# Altium PCB PCB1.PcbDoc
Units mm, origin at the board's own origin, x right, y up, seen from the top; angles counter-clockwise.
Board outline 70 x 100 mm, 2 copper layers (Top Layer, Bottom Layer); 40 components, 25 nets, 101 pads, 0 vias.
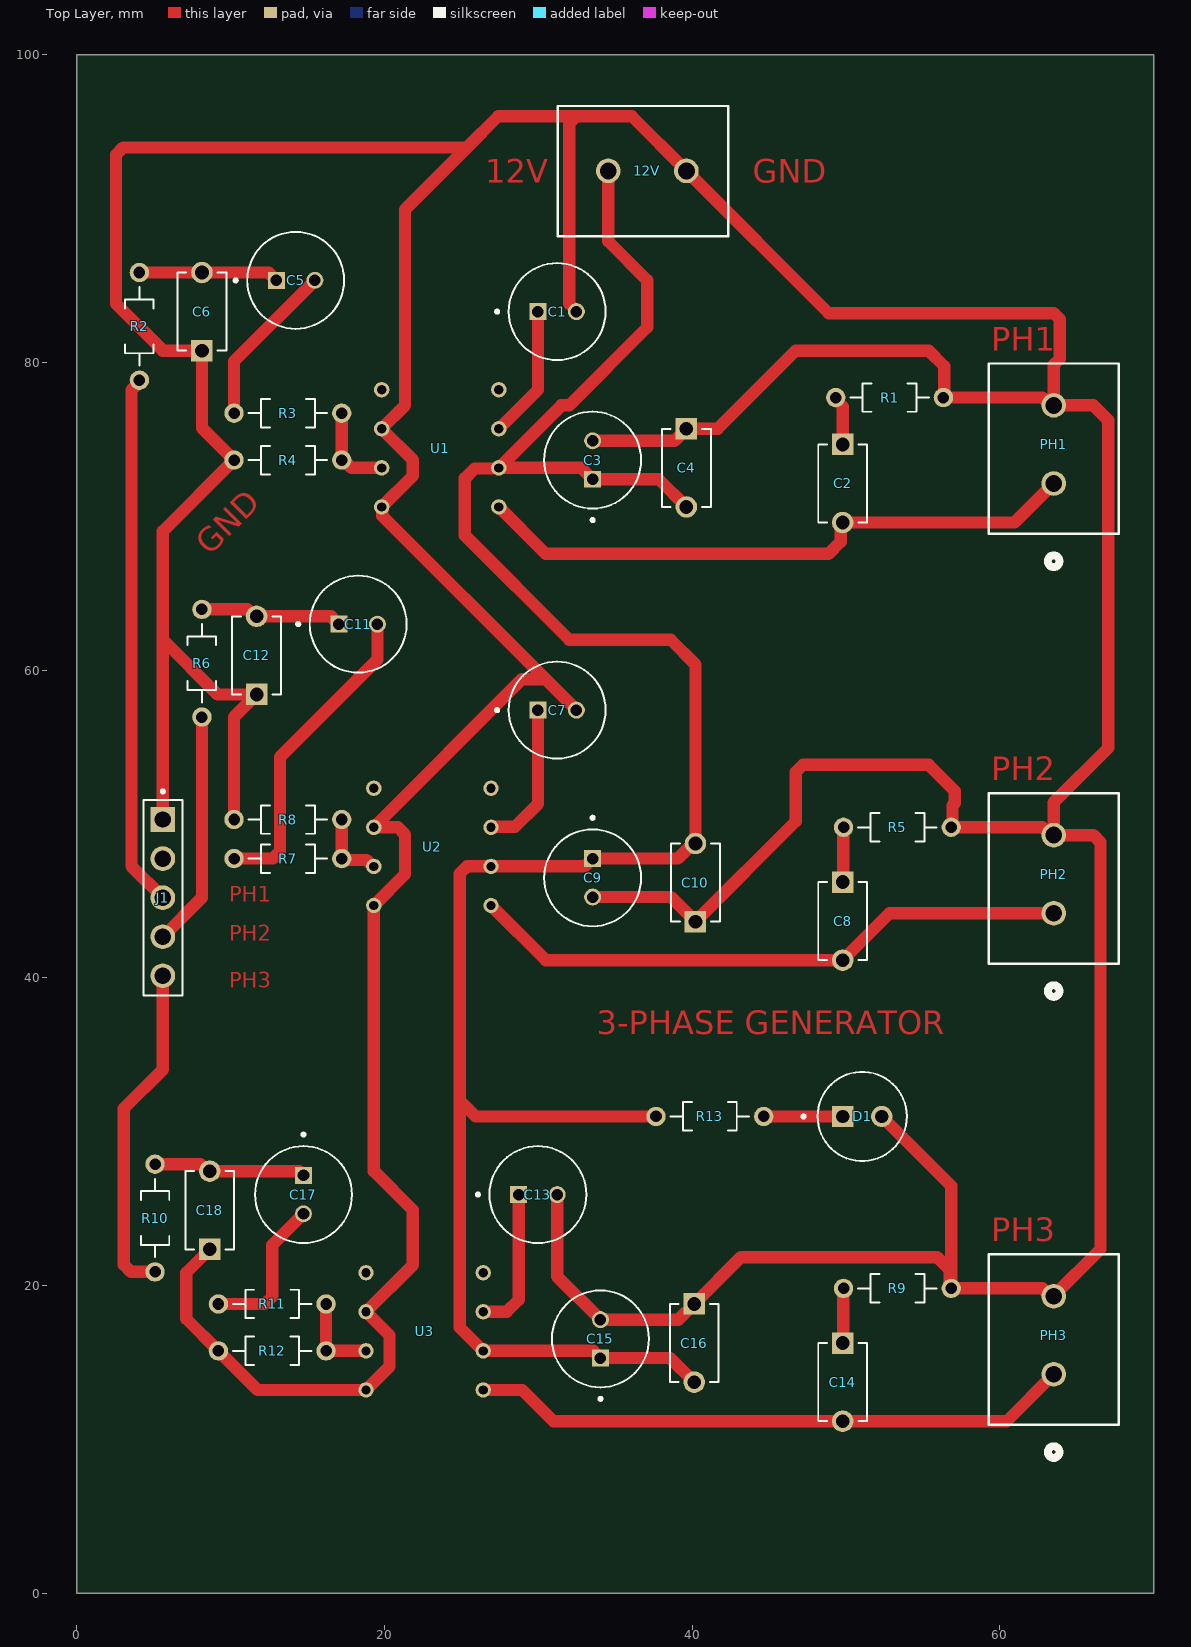
[diagram p0: Top Layer view]
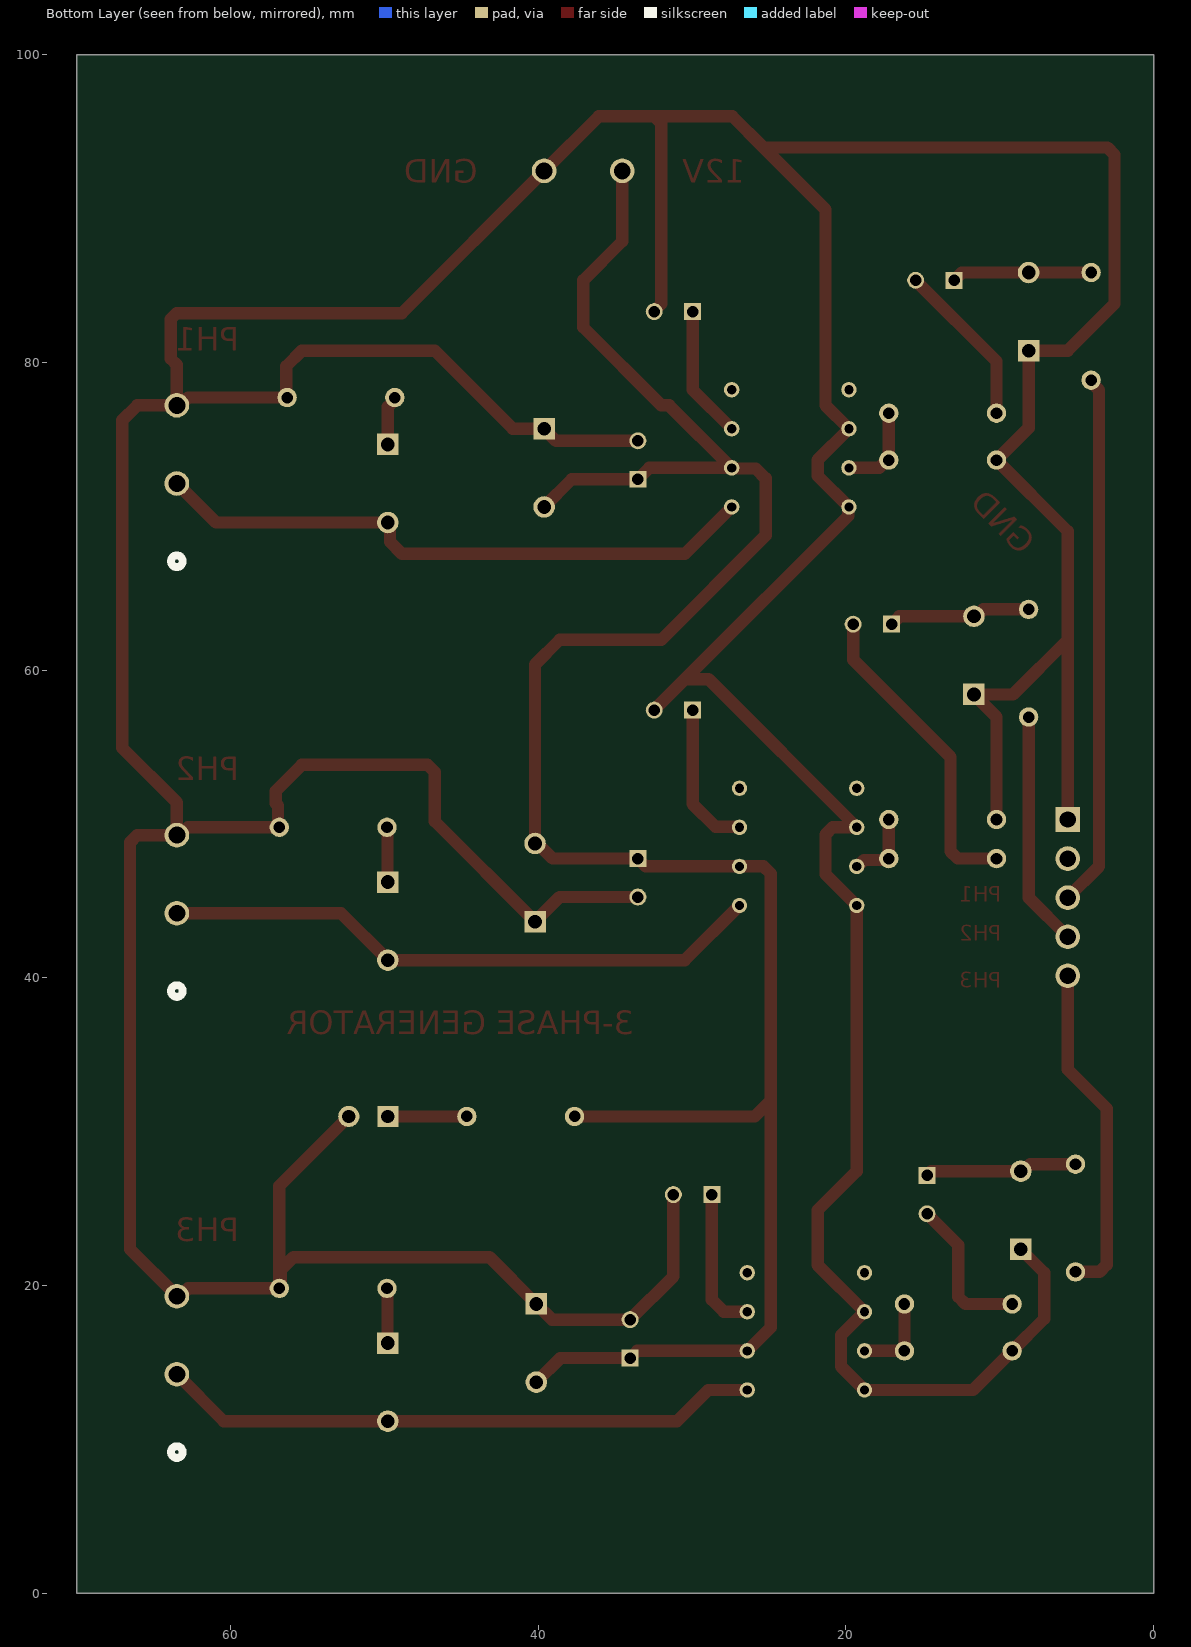
[diagram p1: Bottom Layer view, seen from below]
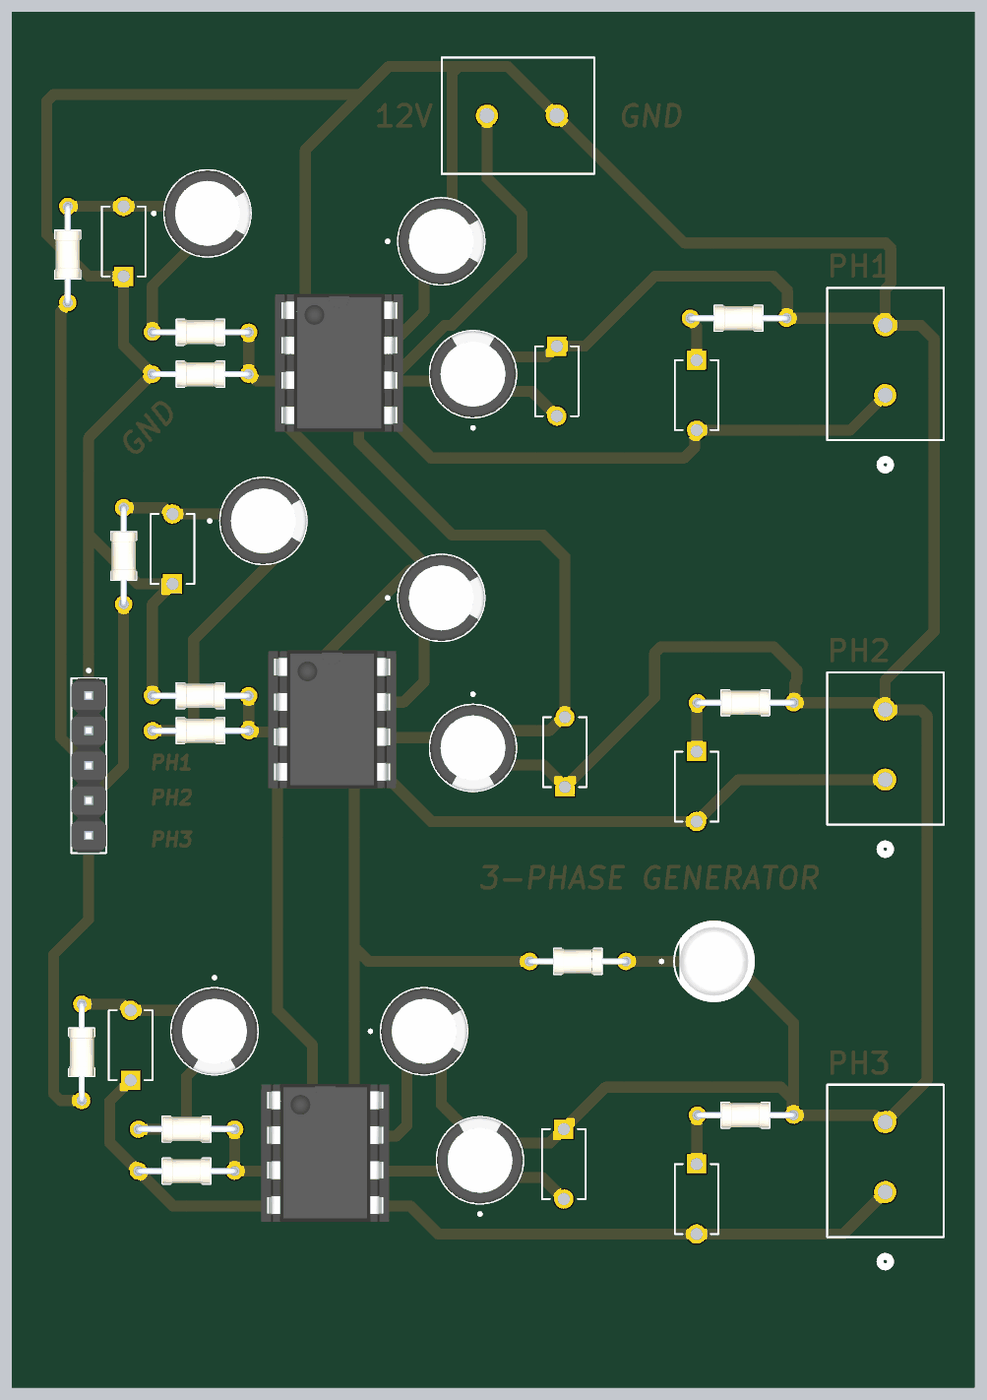
[diagram p2: 3D render of the assembled board from above, using the file's embedded part models]

## Layer stack, top to bottom
Top Solder: solder mask 0.0102, Solder Resist, Dk 3.5
Top Layer: signal copper 0.0356
Dielectric 1: dielectric 0.32, FR-4, Dk 4.8
Bottom Layer: signal copper 0.0356
Bottom Solder: solder mask 0.0102, Solder Resist, Dk 3.5

## Board outline
0,0 70,0 70,100 0,100

## Design rules (kind name [scope] priority, off if disabled: settings)
Clearance [All] p1: gap=0.254 ignorepadtopadclearanceinfootprint=FALSE
PolygonConnect [All] p1: connectstyle=Relief reliefconductorwidth=0.254 reliefentries=4 polygonreliefangle="90 Angle" airgapwidth=0.254
RoutingVias [All] p1: holewidth=0.711 width=1.27 viastyle="Through Hole" minholewidth=0.711 minwidth=1.27 maxholewidth=0.711 maxwidth=1.27
SolderMaskExpansion [All] p1: expansion=0.102 istentingtop=FALSE
SupplyNets "Schematic Supply Nets_2" [InNet('+5')] p1: voltage=0.000
SupplyNets "Schematic Supply Nets_1" [InNet('+12')] p2: voltage=0.000
SupplyNets "Schematic Supply Nets" [InNet('GND')] p3: voltage=0.000
Width [All] p1: maxlimit=1 minlimit=0.254 preferedwidth=1 toplayer_minwidth=0.8 bottomlayer_maxwidth=0.254 bottomlayer_prefwidth=0.254 minimp=50.000000 maximp=50.000000 favimp=50.000000
30 further rules are at their usual default settings.

## Components (designator, comment, footprint, x,y, rotation, side; value= is the part's Value field where it differs from the comment)
12V "398800302" CONN_398800302_MOL 34.544,92.456 r0 top
C1 "10uF" CAPPRD250W50D630H1120 31.222,83.312 r0 top
C2 "47nF" CAPRR508W50L508T318H762 49.784,72.136 r270 top
C3 "10uF" CAPPRD250W50D630H1120 33.528,73.66 r90 top
C4 "100nF" CAPRR508W50L508T318H762 39.624,73.152 r270 top
C5 "10uF" CAPPRD250W50D630H1120 14.224,85.344 r0 top
C6 "100nF" CAPRR508W50L508T318H762 8.128,83.312 r90 top
C7 "10uF" CAPPRD250W50D630H1120 31.222,57.404 r0 top
C8 "47nF" CAPRR508W50L508T318H762 49.784,43.688 r270 top
C9 "10uF" CAPPRD250W50D630H1120 33.528,46.502 r270 top
C10 "100nF" CAPRR508W50L508T318H762 40.214,46.194 r90 top
C11 "10uF" CAPPRD250W50D630H1120 18.288,62.992 r0 top
C12 "100nF" CAPRR508W50L508T318H762 11.684,60.96 r90 top
C13 "10uF" CAPPRD250W50D630H1120 29.972,25.908 r0 top
C14 "47nF" CAPRR508W50L508T318H762 49.784,13.716 r270 top
C15 "10uF" CAPPRD250W50D630H1120 34.036,16.53 r90 top
C16 "100nF" CAPRR508W50L508T318H762 40.132,16.256 r270 top
C17 "10uF" CAPPRD250W50D630H1120 14.732,25.908 r270 top
C18 "100nF" CAPRR508W50L508T318H762 8.636,24.892 r90 top
D1 "RED" LEDRD254W51D580H870 51.054,30.988 r0 top
J1 "MCU" HARWIN_M20-9990546 5.588,45.212 r270 top
PH1 "398800302" CONN_398800302_MOL 63.5,72.136 r90 top
PH2 "398800302" CONN_398800302_MOL 63.5,44.196 r90 top
PH3 "398800302" CONN_398800302_MOL 63.5,14.224 r90 top
R1 "10" RESAD700W45L350D185 52.832,77.724 r180 top
R2 "1K" RESAD700W45L350D185 4.064,82.352 r90 top
R3 "10K" RESAD700W45L350D185 13.716,76.708 r0 top
R4 "1K" RESAD700W45L350D185 13.716,73.66 r0 top
R5 "10" RESAD700W45L350D185 53.34,49.784 r180 top
R6 "1K" RESAD700W45L350D185 8.128,60.452 r90 top
R7 "10K" RESAD700W45L350D185 13.716,47.752 r0 top
R8 "1K" RESAD700W45L350D185 13.716,50.292 r0 top
R9 "10" RESAD700W45L350D185 53.34,19.812 r180 top
R10 "1K" RESAD700W45L350D185 5.08,24.384 r90 top
R11 "10K" RESAD700W45L350D185 12.7,18.796 r0 top
R12 "1K" RESAD700W45L350D185 12.7,15.748 r0 top
R13 "1K" RESAD700W45L350D185 41.148,30.988 r0 top
U1 "LM386" PCBComponent_1 19.812,79.502 r270 top
U2 "LM386" PCBComponent_1 19.304,53.594 r270 top
U3 "LM386" PCBComponent_1 18.796,22.098 r270 top

## Footprints (in the part's own frame and the unit in brackets; to place one, negate y for a bottom-side part, rotate by r counter-clockwise, add the part's x,y. Pads: shape width x height; smd on the part's side, far side on the other; paste and mask are expansions set on the pad)
CAPPRD250W50D630H1120 [mm]
  round 1.1 hole 0.75: N(1.25,0)
  rect 1.1x1.1 hole 0.75: P(-1.25,0)
  silkscreen extent -4,-3.15 3.15,3.15, body extent -3.15,-3.15 3.15,3.15, height 11.2
CAPRR508W50L508T318H762 [mm]
  rect 1.398x1.398 / inner round 1.398 / far side rect 1.398x1.398 hole 0.89: 1(-2.54,0)
  round 1.398 hole 0.89: 2(2.54,0)
  silkscreen extent -2.54,-1.59 2.54,1.59
CONN_398800302_MOL [mil]
  round 63 hole 43: 1(0,0) 2(200,0)
  silkscreen extent -129,-167 307,166, body extent -124,-150 300,170, height 391
HARWIN_M20-9990546 [mm]
  rect 1.605x1.605 / inner round 1.605 / far side rect 1.605x1.605 hole 1.07: 1(-5.08,0)
  round 1.605 hole 1.07: 2(-2.54,0) 3(0,0) 4(2.54,0) 5(5.08,0)
  silkscreen extent -7.01,-1.27 6.35,1.27, body extent -6.35,-1.27 6.35,1.27, height 8.74
LEDRD254W51D580H870 [mm]
  rect 1.378x1.378 / inner round 1.378 / far side rect 1.378x1.378 hole 0.87 mask+0.102: 1(-1.27,0)
  round 1.378 hole 0.87 mask+0.102: 2(1.27,0)
  silkscreen extent -3.91,-2.9 2.9,2.9, body extent -2.5,-2.9 2.9,2.9, height 8.7
PCBComponent_1 [mm]
  round 1 hole 0.6: 1(1.27,0) 2(3.81,0) 3(6.35,0) 4(8.89,0) 5(8.89,7.62) 6(6.35,7.62) 7(3.81,7.62) 8(1.27,7.62)
  body extent 0.01,-0.66 10.03,8.64, height 7.47
RESAD700W45L350D185 [mm]
  round 1.258 hole 0.75: 1(-3.5,0) 2(3.5,0)
  silkscreen extent -2.55,-0.92 2.55,0.92, body extent -3.72,-0.92 3.72,0.92, height 1.84

## Part data
12V PH1 PH2 PH3: "2 Position Wire to Board Terminal Block Horizontal with Board 0.200 (5.08mm) Through Hole", Package=None, Check_prices=https://www.snapeda.com/parts/0398800302/Molex/view-part/?ref=eda, MF=Molex, MP=0398800302, SnapEDA_Link=https://www.snapeda.com/parts/0398800302/Molex/view-part/?ref=snap
C1 C3 C5 C7 C9 C11 C13 C15 C17: library part EEUHD1E101, "Ø®Ø§Ø²Ù† Ù‡Ø§ÛŒ Ø§Ù„Ú©ØªØ±ÙˆÙ„ÛŒØªÛŒ Ø¢Ù„ÙˆÙ…ÛŒÙ†ÛŒÙˆÙ…ÛŒ 100F 25V Ø´Ø¹Ø§Ø¹ÛŒØŒ Ù‚ÙˆØ·ÛŒ 1000 Ø³Ø§Ø¹Øª @ 105C", Package="RADIAL-2 Panasonic", Availability="In Stock", Check_prices=https://www.snapeda.com/parts/EEU-HD1E101/Panasonic/view-part/?ref=eda, MF=Panasonic, MP=EEU-HD1E101, Price=None, Purchase-URL=https://pricing.snapeda.com/search/part/EEU-HD1E101/?ref=eda, SnapEDA_Link=https://www.snapeda.com/parts/EEU-HD1E101/Panasonic/view-part/?ref=snap
C2 C4 C6 C8 C10 C12 C14 C16 C18: library part AR215C104K4R, "AR 100nF Ceramic Multilayer Cap,50V dc,+125C,X7R Dielectric,+/-10%,Through Hole", Package="Radial AVX", Check_prices=https://www.snapeda.com/parts/AR215C104K4R/AVX/view-part/?ref=eda, MF=AVX, MP=AR215C104K4R, SnapEDA_Link=https://www.snapeda.com/parts/AR215C104K4R/AVX/view-part/?ref=snap
D1: library part OVLFR3C7, "Red 5 mm 30Â° Clear 5000 mcd 2.2 V Round LED Lamp Through Hole", Package="Radial Optek", Check_prices=https://www.snapeda.com/parts/OVLFR3C7/Optek/view-part/?ref=eda, MF=Optek, MP=OVLFR3C7, SnapEDA_Link=https://www.snapeda.com/parts/OVLFR3C7/Optek/view-part/?ref=snap
J1: library part M20-9990546, Package=None, Availability=Unavailable, MF=Harwin, MP=M20-9990546, Price=None
R1 R3 R5 R7 R9 R11: library part 2-1623927-3, "Carbon Film Resistors - Through Hole 1K Ohm 5% 1/4W Res Carbon Film", Package=None, Power_Rating=".25 W", Resistance=1K, Tolerance=5%, Voltage_Rating="200 V", Check_prices=https://www.snapeda.com/parts/2-1623927-3/TE+Connectivity/view-part/?ref=eda, EU_RoHS_Compliance=Compliant, MF="TE Connectivity", MP=2-1623927-3, SnapEDA_Link=https://www.snapeda.com/parts/2-1623927-3/TE+Connectivity/view-part/?ref=snap
R2 R4 R6 R8 R10 R12 R13: library part 2-1623927-3, "Carbon Film Resistors - Through Hole 1K Ohm 5% 1/4W Res Carbon Film", Package=None, Power_Rating=".25 W", Tolerance=5%, Voltage_Rating="200 V", Check_prices=https://www.snapeda.com/parts/2-1623927-3/TE+Connectivity/view-part/?ref=eda, EU_RoHS_Compliance=Compliant, MF="TE Connectivity", MP=2-1623927-3, Resistance=1K, SnapEDA_Link=https://www.snapeda.com/parts/2-1623927-3/TE+Connectivity/view-part/?ref=snap
U1 U2 U3: library part "DIP-8 Socket"

## Nets (pads, with @x,y where several pads share a name; then routed paths per layer and width w, separated by ;. In a path a pad name is that pad's centre, name@x,y a point inside that pad or via, vN(x,y) a via of type N, cw(c..) or ccw(c..) an arc to the next point about the centre after c; other vN are vias at no path point)
+5: J1.2
+12: 12V.1 C3.P C4.2 C9.P C10.2 C15.P C16.2 R13.1 U1.6 U2.6 U3.6 | length 149.7
  Top Layer w0.8: 12V.1 34.544,87.884 37.084,85.344 37.084,82.296 32.004,77.216 31.496,77.216 U1.6 ; R13.1 25.928,30.988 24.892,32.024 ; C4.2 37.826,72.41 C3.P 32.786,73.152 U1.6 ; C16.2 38.568,15.28 C15.P 33.568,15.748 U3.6 24.892,17.272 24.892,32.024 ; 24.892,32.024 24.892,46.775 25.361,47.244 U2.6 33.02,47.244 C9.P 39.069,47.752 40.052,48.734 C10.2 40.214,60.37 38.608,61.976 32.004,61.976 25.223,68.757 25.223,72.467 25.87,73.114 27.394,73.114 U1.6
GND: 12V.2 C1.N C3.N C4.1 C6.1 C7.N C9.N C10.1 C12.1 C13.N C15.N C16.1 C18.1 D1.2 J1.1 PH1.2 PH2.2 PH3.2 R1.1 R4.1 R5.1 R8.1 R9.1 R12.1 U1.2 U1.4 U2.2 U2.4 U3.2 U3.4 | length 472.4
  Top Layer w0.8: J1.1 5.588,61.976 ; C18.1 7.112,20.828 7.112,17.836 R12.1 11.74,13.208 U3.4 20.32,14.732 20.32,16.764 U3.2 21.844,21.336 21.844,24.892 19.304,27.432 U2.4 21.336,46.736 21.336,49.315 20.867,49.784 U2.2 28.936,59.416 30.46,59.416 ; R8.1 10.216,56.952 C12.1 9.144,58.42 5.588,61.976 ; C13.N 31.222,20.594 C15.N 39.116,17.78 C16.1 43.18,21.844 55.919,21.844 56.752,21.011 56.752,19.9 R9.1 ; C7.N 30.46,59.416 ; C1.N 32.472,83.352 32.004,83.82 32.004,95.543 32.473,96.012 ; C9.N 38.616,45.252 C10.1 46.736,50.177 46.736,53.379 47.205,53.848 55.372,53.848 57.073,52.147 57.073,51.347 56.928,51.202 56.928,49.872 R5.1 62.775,49.784 63.283,49.276 PH2.2 ; C3.N 38.842,74.91 C4.1 41.656,75.692 46.736,80.772 55.372,80.772 56.388,79.756 56.388,77.78 R1.1 62.775,77.724 63.283,77.216 PH1.2 ; D1.2 56.84,26.472 R9.1 ; 5.588,61.976 5.588,69.032 R4.1 8.128,75.748 C6.1 5.588,80.772 2.54,83.82 2.54,93.511 3.009,93.98 25.365,93.98 ; 25.365,93.98 21.336,89.951 21.336,77.216 U1.2 21.844,73.66 21.844,72.644 U1.4 19.85,70.574 19.85,70.026 30.46,59.416 ; 25.365,93.98 27.397,96.012 32.473,96.012 ; 32.473,96.012 36.068,96.012 12V.2 48.876,83.204 63.516,83.204 63.899,82.82 63.899,80.247 63.5,79.848 PH1.2 ; R9.1 62.775,19.812 63.283,19.304 PH3.2 66.548,22.352 66.548,48.807 66.079,49.276 PH2.2 ; PH2.2 63.5,51.4 67.056,54.956 67.056,76.239 66.079,77.216 PH1.2
NetC1_P: C1.P U1.7 | length 8.7
  Top Layer w0.8: U1.7 29.972,78.232 C1.P
NetC2_1: C2.1 R1.2 | length 3.2
  Top Layer w0.8: R1.2 49.332,77.573 49.784,77.121 C2.1
NetC2_2: C2.2 PH1.1 U1.5 | length 39.9
  Top Layer w0.8: U1.5 30.48,67.564 48.866,67.564 49.65,68.348 49.65,69.462 C2.2 60.96,69.596 PH1.1
NetC5_N: C5.N R3.1 | length 10.8
  Top Layer w0.8: R3.1 10.216,80.086 C5.N
NetC5_P: C5.P C6.2 R2.2 | length 9.1
  Top Layer w0.8: R2.2 C6.2 12.466,85.852 C5.P
NetC7_P: C7.P U2.7 | length 9.8
  Top Layer w0.8: U2.7 26.962,49.822 28.486,49.822 29.972,51.308 C7.P
NetC8_1: C8.1 R5.2 | length 3.6
  Top Layer w0.8: C8.1 49.812,46.256 49.812,49.756 R5.2
NetC8_2: C8.2 PH2.1 U2.5 | length 39.3
  Top Layer w0.8: U2.5 30.48,41.148 C8.2 52.832,44.196 PH2.1
NetC11_N: C11.N R7.1 | length 20.6
  Top Layer w0.8: R7.1 12.739,47.752 13.208,48.221 13.208,54.356 19.538,60.686 C11.N
NetC11_P: C11.P C12.2 R6.2 | length 9.3
  Top Layer w0.8: R6.2 11.07,63.952 11.522,63.5 C12.2 16.53,63.5 C11.P
NetC13_P: C13.P U3.7 | length 9.4
  Top Layer w0.8: U3.7@26.47,18.288 27.94,18.288 28.722,19.07 C13.P
NetC14_1: C14.1 R9.2 | length 3.6
  Top Layer w0.8: C14.1 49.812,16.284 49.812,19.784 R9.2
NetC14_2: C14.2 PH3.1 U3.5 | length 39.2
  Top Layer w0.8: U3.5 28.956,13.208 30.988,11.176 C14.2 60.452,11.176 PH3.1
NetC17_N: C17.N R11.1 | length 9.9
  Top Layer w0.8: R11.1 12.231,18.796 12.7,19.265 12.7,22.626 C17.N
NetC17_P: C17.P C18.2 R10.2 | length 10
  Top Layer w0.8: R10.2 8.022,27.884 8.474,27.432 C18.2 14.458,27.432 C17.P
NetD1_1: D1.1 R13.2 | length 5.1
  Top Layer w0.8: R13.2 D1.1
NetR3_2: R3.2 R4.2 U1.3 | length 5.9
  Top Layer w0.8: R3.2 R4.2 17.34,73.66 17.848,73.152 U1.3
NetR7_2: R7.2 R8.2 U2.3 | length 4.8
  Top Layer w0.8: R8.2 R7.2 17.304,47.664 18.83,47.664 19.25,47.244 U2.3
NetR11_2: R11.2 R12.2 U3.3 | length 5.6
  Top Layer w0.8: R11.2 R12.2 U3.3
PH1: J1.3 R2.1 | length 34.7
  Top Layer w0.8: R2.1 4.064,78.728 3.556,78.22 3.556,47.244 J1.3
PH2: J1.4 R6.1 | length 15.3
  Top Layer w0.8: J1.4 8.128,45.212 R6.1
PH3: J1.5 R10.1 | length 22.1
  Top Layer w0.8: R10.1 3.517,20.884 3.048,21.353 3.048,31.496 5.588,34.036 J1.5
pads on no net: U1.1 U1.8 U2.1 U2.8 U3.1 U3.8

## Other copper
Top Layer:
  text "GND" at 43.942,91.694 h1.52
  text "GND" at 8.636,67.415 h1.52 r45
  text "PH1" at 9.906,44.958 h1
  text "PH2" at 9.906,42.418 h1
  text "PH3" at 9.906,39.37 h1
  text "3-PHASE GENERATOR" at 33.782,36.322 h1.52

## Silkscreen, mask and mechanical layers (free items; w line width, h text height)
Mechanical 1:
  lines w0.254: 0,0 70,0 70,100.076 0,100.076 0,0